# Altium PCB Switch_Matrix_32_2.PCBDOC (part 7 of 9)
Units mm, origin at the board's own origin, x right, y up, seen from the top; angles counter-clockwise.
Board outline 222.54 x 100 mm, 6 copper layers (L1, P2, L3, P4, L5, L6), stack 1.61 mm thick; 629 components, 583 nets, 2332 pads, 825 vias.
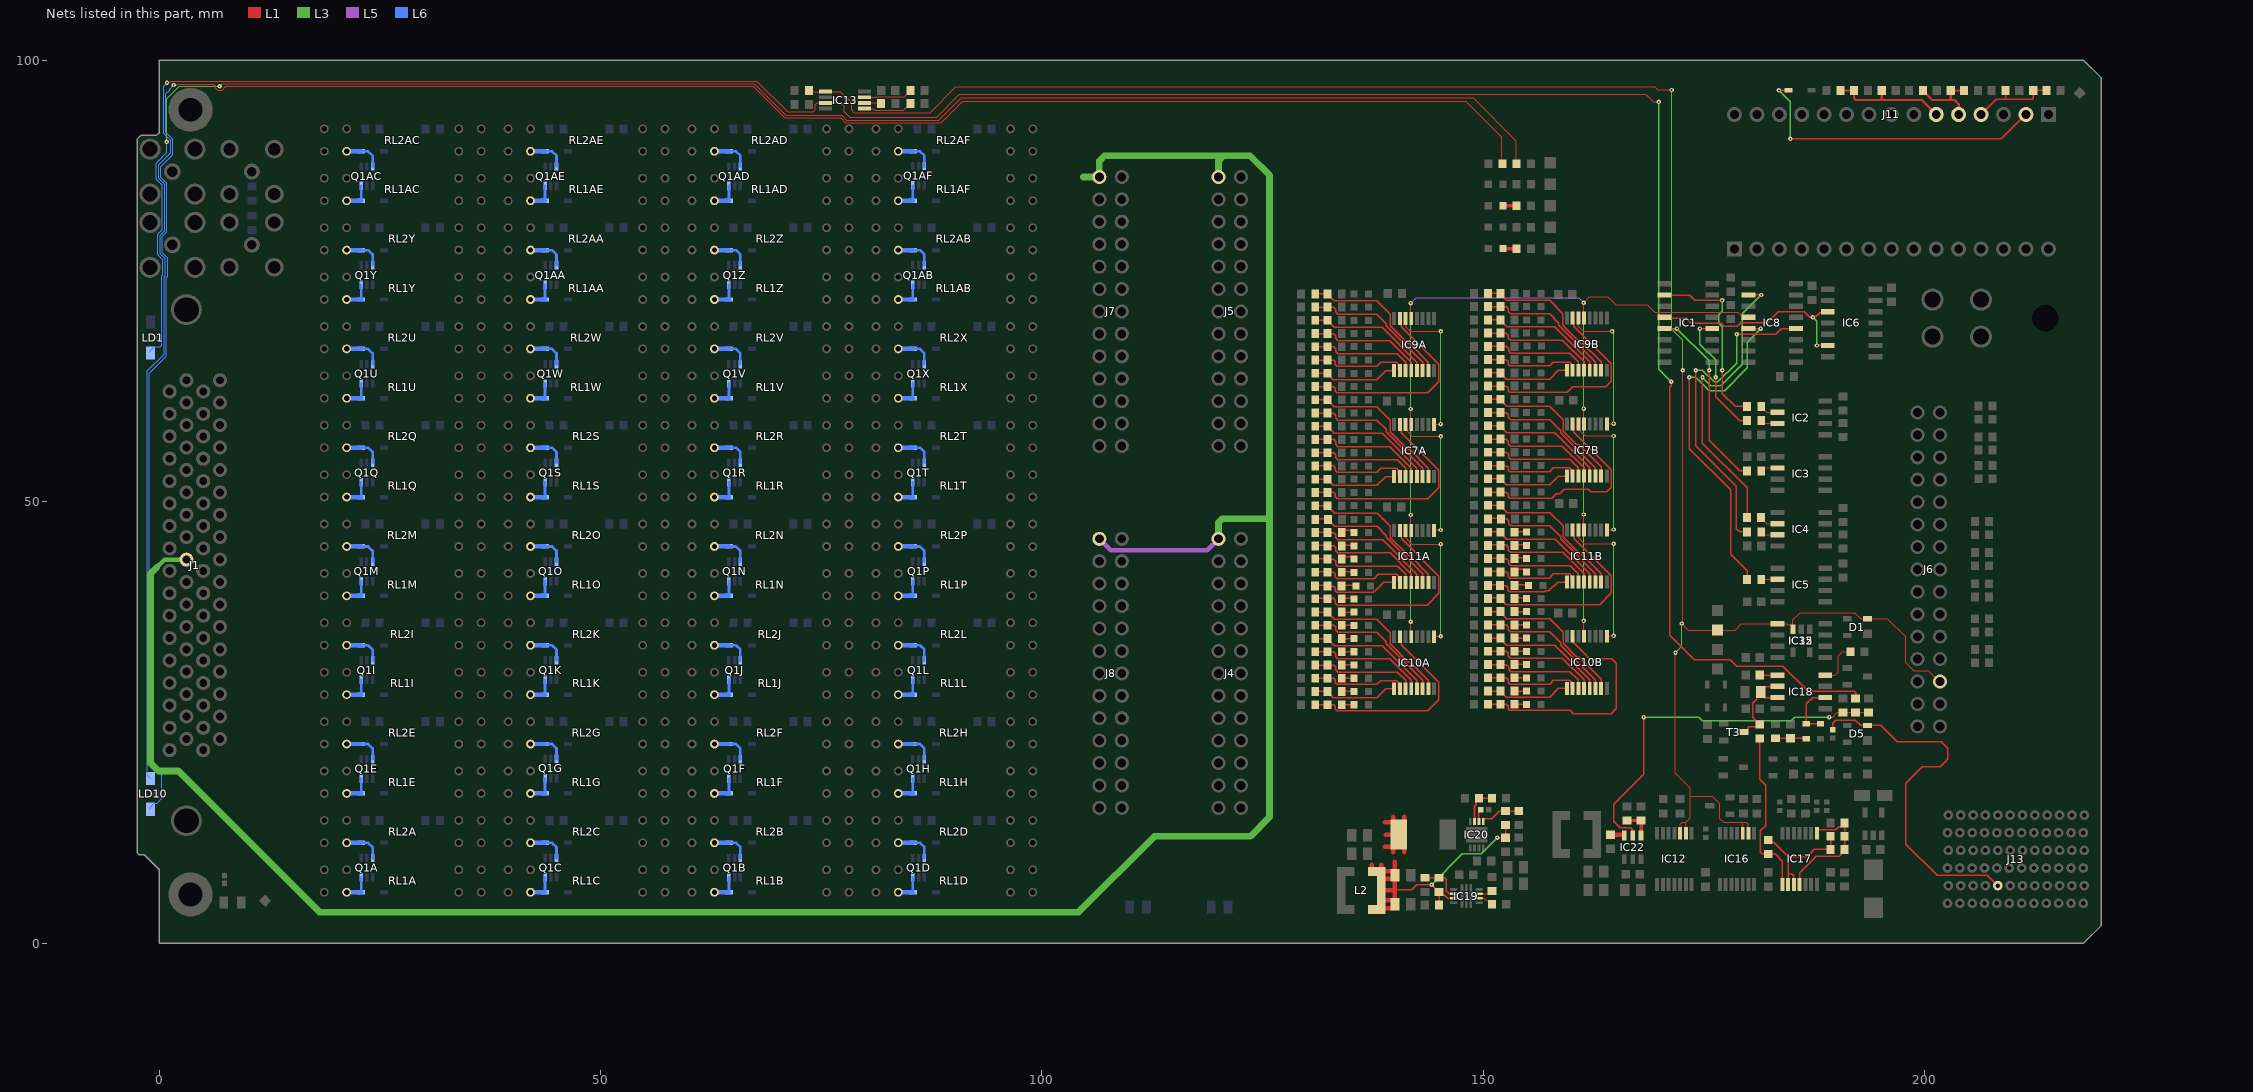
[diagram p10: the nets of this part, all layers, seen from the top]

## Via types
v1: diameter 0.5, hole 0.2, L1 to L6, tented both sides, 775 vias
v2: diameter 0.7, hole 0.4, L1 to L6, tented both sides, 41 vias
v3: diameter 0.5, hole 0.2, L1 to L6, 5 vias
v4: diameter 0.6, hole 0.3, L1 to L6, tented both sides, 4 vias

## Nets (pads, with @x,y where several pads share a name; then routed paths per layer and width w, separated by ;. In a path a pad name is that pad's centre, name@x,y a point inside that pad or via, vN(x,y) a via of type N, cw(c..) or ccw(c..) an arc to the next point about the centre after c; other vN are vias at no path point) (continued)
I2C0_SDA: D1.2 IC12.2 IC12.3 IC13.1 IC15.5 IC16.2 IC16.3 IC32.3 J6.26 R175.1 TP1.1 | length 235.7
  L1 w0.127: R175.1@73.6,96.6 73.725,96.475 IC13.1@75.5,96.475 77.186,96.475 78.476,95.185 78.476,94.381 78.768,94.089 87.359,94.089 90.272,97.002 169.41,97.002 169.765,96.647 v1(171.345,96.647) v1@171.354,96.647 ; v1(171.784,32.884) 171.784,19.216 173.465,17.535 173.465,16.551 ; IC12.3@172.31,12.465 172.31,13.437 172.537,13.665 172.96,13.665 ; v1(172.604,64.9) 172.604,36.461 172.571,36.428 172.571,36.271 v1(172.5,36.2) 173.24,35.46 TP1.1@176.551,35.46 178.56,35.46 179.265,36.165 IC15.5@183.351,36.165 184.404,36.165 184.522,36.047 184.864,36.047 IC32.3@185.1,35.811 ; IC12.2@172.96,12.465 172.96,13.665 ; IC16.3@179.409,12.465 179.409,13.665 ; IC16.2@180.059,12.465 180.059,13.437 179.831,13.665 179.409,13.665 ; IC32.3@185.1,35.561 IC32.3@185.1,35.811 ; J6.26@201.75,29.63 201.643,29.63 200.449,30.825 198.778,30.825 197.868,31.734 197.868,34.682 195.801,36.75 D1.2@193.55,36.75 192.75,36.75 192.1,37.4 185.9,37.4 185.1,36.6 IC32.3@185.1,35.811 ; 172.96,13.665 173.465,14.17 173.465,16.551 ; 173.465,16.551 173.54,16.625 175.965,16.625 176.8,15.791 176.8,14.1 177.235,13.665 179.409,13.665
  L3 w0.127: v1(171.345,96.647) 171.345,69.555 172.604,68.296 v1(172.604,64.9) ; v1(171.784,32.884) 172.5,33.6 v1(172.5,36.2)
N13V0_SCSI: J1.52 J4.26 J5.26 J7.26 J8.26 | length 285.9
  L5 w0.508: J8.26@106.517,45.796 107.814,44.5 118.721,44.5 J4.26@120.017,45.796
  L3 w0.508: -0.269,42.572 0.6,43.441 J1.52@2.759,43.441
  L3 w0.762: -0.269,42.572 -0.984,41.858 -0.984,20.384 -0.089,19.489 2.182,19.489 18.171,3.5 104.151,3.5 112.74,12.089 123.617,12.089 125.8,14.272 125.8,43.4 125.8,47.661 125.8,48.08 ; 104.696,86.796 J7.26@106.517,86.796 106.517,88.617 107.1,89.2 120.6,89.2 ; J4.26@120.017,45.796 120.017,47.634 120.464,48.08 125.8,48.08 ; J5.26@120.017,86.796 120.017,88.617 120.6,89.2 ; 120.6,89.2 123.6,89.2 125.8,87 125.8,48.08
NetC5_2: C5.2 J11.5 R19.1 R70.2 | length 8.5
  L1 w0.254: R19.1@199.837,96.6 199.837,96.55 200.887,95.5 202.965,95.5 ; J11.5@203.87,93.87 203.87,95.03 203.4,95.5 202.965,95.5 ; R70.2@204.5,96.562 R70.2@204.462,96.6 C5.2@202.975,96.6 202.975,95.51 202.965,95.5
NetC6_2: C6.2 J11.4 R71.2 R87.1 | length 10
  L1 w0.152: J11.4@206.41,93.87 208.14,95.6 209.2,95.6 ; R71.2@209.2,96.6 209.2,95.6 ; R87.1@213.8,96.6 212.3,96.6 212.3,95.7 212.2,95.6 209.2,95.6
NetC7_2: C7.2 J11.6 R18.1 R69.2 | length 13.6
  L1 w0.254: R18.1@190.5,96.6 R69.2@192.012,96.6 192.012,95.712 192.225,95.5 195.082,95.5 ; C7.2@195.15,96.6 195.15,95.568 195.082,95.5 ; J11.6@201.33,93.87 199.7,95.5 195.082,95.5
NetC11_2: C11.2 C13.2 C14.2 C32.2 IC19.6 L1.2 L2.1 R23.2 R118.2 | length 45.9
  L1 w0.152: 140,6.2 140.168,6.032 141.932,6.032 142.5,6.6 v1(144.15,6.6) 144.95,5.8 R23.2@145,5.8 C11.2@145,4.3 ; R23.2@145.028,5.436 145.622,5.436 145.983,5.075 IC19.6@146.642,5.075 ; v1(151.601,11.946) 152.526,11.946 C32.2@152.53,11.95 R118.2@152.53,13.35
  L1 w0.508: L2.1@137.387,7.869 137.387,8.869 ; L2.1@138.375,4.844 C13.2@139.875,4.844 ; L2.1@138.375,8.144 L2.1@138.463,8.144 ; L2.1@138.379,3.959 C13.2@139.879,3.959 ; L2.1@138.379,7.259 C14.2@139.879,7.259 ; L2.1@138.45,5.957 139.95,5.957 ; L2.1@138.463,7.404 L2.1@138.463,8.144 ; 138.463,8.864 L2.1@138.463,8.144 ; 138.825,10.918 L1.2@139.83,10.918 ; 138.825,13.668 L1.2@139.83,13.668 ; 138.942,12.293 L1.2@140.442,12.293 ; 139.83,10.262 L1.2@139.83,10.918 ; L1.2@139.83,11.762 L1.2@139.83,10.918 ; L1.2@139.83,12.824 L1.2@139.83,13.668 ; 139.83,14.324 L1.2@139.83,13.668 ; C14.2@139.875,8.144 L2.1@138.463,8.144 ; C13.2@140,4.4 140,5.9 ; 140,6.2 C14.2@140,7.7 140,9.2 ; L1.2@140.325,10.918 L1.2@139.83,10.918 ; L1.2@140.325,13.668 L1.2@139.83,13.668 ; 141.054,10.262 L1.2@141.054,11.762 ; L1.2@141.054,12.824 141.054,14.324
  L3 w0.152: v1(144.15,6.6) 147.65,10.1 149.755,10.1 v1(151.601,11.946)
NetC25_2: C25.2 IC18.6 IC18.7 R114.2 T3.3 | length 10.1
  L1 w0.152: T3.3@179.55,23.9 179.707,23.9 179.956,24.149 179.956,24.362 180.089,24.495 181.046,24.495 R114.2@181.326,24.775 181.276,24.775 180.902,25.149 180.902,25.199 180.539,25.561 180.539,27.141 181.021,27.622 181.021,28.005 C25.2@181.451,28.435 ; C25.2@181.451,29.05 183.316,29.05 IC18.6@183.351,29.085 ; C25.2@181.786,27.815 IC18.7@183.351,27.815 IC18.7@183.355,27.82
NetC27_2: C27.2 IC18.5 | length 2
  L1 w0.152: C27.2@181.351,30.355 IC18.5@183.351,30.355
NetC28_2: C28.2 D9.1 R116.2 | length 3.5
  L1 w0.152: R116.2@183.1,23.2 C28.2@184.8,23.2 186.55,23.2 D9.1@186.6,23.15
NetC30_2: C30.2 IC19.9 | length 1.8
  L1 w0.127: IC19.9@149.542,5.075 150.159,5.075 ; 150.145,5.075 150.415,4.805 150.595,4.805 C30.2@151,4.4
NetC33_2: C33.2 IC20.6 | length 1.4
  L1 w0.152: IC20.6@149.52,13.75 149.52,14.875 C33.2@149.74,15.095
NetC102_1: C102.1 IC22.6 | length 1.5
  L1 w0.508: C102.1@164.438,12.282 IC22.6@165.988,12.282
NetD3_2: D3.2 J11.2 | length 35
  L1 w0.152: v1(183.5,96.6) D3.2@184.6,96.6 ; v1(184.8,91.1) 208.72,91.1 J11.2@211.49,93.87
  L3 w0.152: v1(183.5,96.6) 184.8,95.3 v1(184.8,91.1)
NetD5_2: D5.2 J13.H2 R133.2 | length 41.6
  L1 w0.152: R133.2@189.6,24.17 189.6,24.9 189.969,25.269 192.131,25.269 192.75,24.65 D5.2@193.55,24.65 195.069,24.65 196.888,22.83 201.887,22.83 202.653,22.064 202.653,20.833 201.809,19.989 199.77,19.989 197.9,18.118 197.9,11.2 201.426,7.674 207.126,7.674 J13.H2@208.3,6.5
NetD8_2: D8.2 D9.2 IC18.2 | length 6.3
  L1 w0.152: D8.2@188.2,24.85 D9.2@186.6,24.85 186.6,27.1 187.315,27.815 IC18.2@188.751,27.815
NetD12A_2: D12A.2 Q1A.3 RL1A.2 | length 3.3
  L6 w0.152: D12A.2@22.878,5.76 D12A.2@22.878,5.76
  L6 w0.3: D12A.2@22.878,5.76 Q1A.3@22.877,7.434
  L6 w0.5: RL1A.2@21.234,5.76 D12A.2@22.878,5.76
NetD12AA_2: D12AA.2 Q1AA.3 RL1AA.2 | length 3.3
  L6 w0.152: D12AA.2@43.714,72.912 D12AA.2@43.714,72.912
  L6 w0.3: D12AA.2@43.714,72.912 Q1AA.3@43.713,74.586
  L6 w0.5: RL1AA.2@42.07,72.912 D12AA.2@43.714,72.912
NetD12AB_2: D12AB.2 Q1AB.3 RL1AB.2 | length 3.3
  L6 w0.152: D12AB.2@85.385,72.913 D12AB.2@85.386,72.912
  L6 w0.3: D12AB.2@85.385,72.913 Q1AB.3@85.385,74.586
  L6 w0.5: RL1AB.2@83.742,72.912 D12AB.2@85.386,72.912
NetD12AC_2: D12AC.2 Q1AC.3 RL1AC.2 | length 3.3
  L6 w0.152: D12AC.2@22.878,84.104 D12AC.2@22.878,84.104
  L6 w0.3: D12AC.2@22.878,84.104 Q1AC.3@22.877,85.778
  L6 w0.5: RL1AC.2@21.234,84.104 D12AC.2@22.878,84.104
NetD12AD_2: D12AD.2 Q1AD.3 RL1AD.2 | length 3.3
  L6 w0.152: D12AD.2@64.55,84.104 D12AD.2@64.55,84.104
  L6 w0.3: D12AD.2@64.55,84.104 Q1AD.3@64.549,85.778
  L6 w0.5: RL1AD.2@62.906,84.104 D12AD.2@64.55,84.104
NetD12AE_2: D12AE.2 Q1AE.3 RL1AE.2 | length 3.3
  L6 w0.152: D12AE.2@43.714,84.104 D12AE.2@43.714,84.104
  L6 w0.3: D12AE.2@43.714,84.104 Q1AE.3@43.713,85.778
  L6 w0.5: RL1AE.2@42.07,84.104 D12AE.2@43.714,84.104
NetD12AF_2: D12AF.2 Q1AF.3 RL1AF.2 | length 3.3
  L6 w0.152: D12AF.2@85.385,84.105 D12AF.2@85.386,84.104
  L6 w0.3: D12AF.2@85.385,84.105 Q1AF.3@85.385,85.778
  L6 w0.5: RL1AF.2@83.742,84.104 D12AF.2@85.386,84.104
NetD12B_2: D12B.2 Q1B.3 RL1B.2 | length 3.3
  L6 w0.152: D12B.2@64.55,5.76 D12B.2@64.55,5.76
  L6 w0.3: D12B.2@64.55,5.76 Q1B.3@64.549,7.434
  L6 w0.5: RL1B.2@62.906,5.76 D12B.2@64.55,5.76
NetD12C_2: D12C.2 Q1C.3 RL1C.2 | length 3.3
  L6 w0.152: D12C.2@43.714,5.76 D12C.2@43.714,5.76
  L6 w0.3: D12C.2@43.714,5.76 Q1C.3@43.713,7.434
  L6 w0.5: RL1C.2@42.07,5.76 D12C.2@43.714,5.76
NetD12D_2: D12D.2 Q1D.3 RL1D.2 | length 3.3
  L6 w0.152: D12D.2@85.385,5.761 D12D.2@85.386,5.76
  L6 w0.3: D12D.2@85.385,5.761 Q1D.3@85.385,7.434
  L6 w0.5: RL1D.2@83.742,5.76 D12D.2@85.386,5.76
NetD12E_2: D12E.2 Q1E.3 RL1E.2 | length 3.3
  L6 w0.152: D12E.2@22.878,16.952 D12E.2@22.878,16.952
  L6 w0.3: D12E.2@22.878,16.952 Q1E.3@22.877,18.626
  L6 w0.5: RL1E.2@21.234,16.952 D12E.2@22.878,16.952
NetD12F_2: D12F.2 Q1F.3 RL1F.2 | length 3.3
  L6 w0.152: D12F.2@64.55,16.952 D12F.2@64.55,16.952
  L6 w0.3: D12F.2@64.55,16.952 Q1F.3@64.549,18.626
  L6 w0.5: RL1F.2@62.906,16.952 D12F.2@64.55,16.952
NetD12G_2: D12G.2 Q1G.3 RL1G.2 | length 3.3
  L6 w0.152: D12G.2@43.714,16.952 D12G.2@43.714,16.952
  L6 w0.3: D12G.2@43.714,16.952 Q1G.3@43.713,18.626
  L6 w0.5: RL1G.2@42.07,16.952 D12G.2@43.714,16.952
NetD12H_2: D12H.2 Q1H.3 RL1H.2 | length 3.3
  L6 w0.152: D12H.2@85.385,16.953 D12H.2@85.386,16.952
  L6 w0.3: D12H.2@85.385,16.953 Q1H.3@85.385,18.626
  L6 w0.5: RL1H.2@83.742,16.952 D12H.2@85.386,16.952
NetD12I_2: D12I.2 Q1I.3 RL1I.2 | length 3.3
  L6 w0.152: D12I.2@22.877,28.145 D12I.2@22.878,28.144
  L6 w0.3: D12I.2@22.877,28.145 Q1I.3@22.877,29.818
  L6 w0.5: RL1I.2@21.234,28.144 D12I.2@22.878,28.144
NetD12J_2: D12J.2 Q1J.3 RL1J.2 | length 3.3
  L6 w0.152: D12J.2@64.549,28.145 D12J.2@64.55,28.144
  L6 w0.3: D12J.2@64.549,28.145 Q1J.3@64.549,29.818
  L6 w0.5: RL1J.2@62.906,28.144 D12J.2@64.55,28.144
NetD12K_2: D12K.2 Q1K.3 RL1K.2 | length 3.3
  L6 w0.152: D12K.2@43.713,28.145 D12K.2@43.714,28.144
  L6 w0.3: D12K.2@43.713,28.145 Q1K.3@43.713,29.818
  L6 w0.5: RL1K.2@42.07,28.144 D12K.2@43.714,28.144
NetD12L_2: D12L.2 Q1L.3 RL1L.2 | length 3.3
  L6 w0.152: D12L.2@85.385,28.145 D12L.2@85.386,28.144
  L6 w0.3: D12L.2@85.385,28.145 Q1L.3@85.385,29.818
  L6 w0.5: RL1L.2@83.742,28.144 D12L.2@85.386,28.144
NetD12M_2: D12M.2 Q1M.3 RL1M.2 | length 3.3
  L6 w0.152: D12M.2@22.878,39.336 D12M.2@22.878,39.336
  L6 w0.3: D12M.2@22.878,39.336 Q1M.3@22.877,41.01
  L6 w0.5: RL1M.2@21.234,39.336 D12M.2@22.878,39.336
NetD12N_2: D12N.2 Q1N.3 RL1N.2 | length 3.3
  L6 w0.152: D12N.2@64.55,39.336 D12N.2@64.55,39.336
  L6 w0.3: D12N.2@64.55,39.336 Q1N.3@64.549,41.01
  L6 w0.5: RL1N.2@62.906,39.336 D12N.2@64.55,39.336
NetD12O_2: D12O.2 Q1O.3 RL1O.2 | length 3.3
  L6 w0.152: D12O.2@43.714,39.336 D12O.2@43.714,39.336
  L6 w0.3: D12O.2@43.714,39.336 Q1O.3@43.713,41.01
  L6 w0.5: RL1O.2@42.07,39.336 D12O.2@43.714,39.336
NetD12P_2: D12P.2 Q1P.3 RL1P.2 | length 3.3
  L6 w0.152: D12P.2@85.385,39.337 D12P.2@85.386,39.336
  L6 w0.3: D12P.2@85.385,39.337 Q1P.3@85.385,41.01
  L6 w0.5: RL1P.2@83.742,39.336 D12P.2@85.386,39.336
NetD12Q_2: D12Q.2 Q1Q.3 RL1Q.2 | length 3.3
  L6 w0.152: D12Q.2@22.878,50.528 D12Q.2@22.878,50.528
  L6 w0.3: D12Q.2@22.878,50.528 Q1Q.3@22.877,52.202
  L6 w0.5: RL1Q.2@21.234,50.528 D12Q.2@22.878,50.528
NetD12R_2: D12R.2 Q1R.3 RL1R.2 | length 3.3
  L6 w0.152: D12R.2@64.55,50.528 D12R.2@64.55,50.528
  L6 w0.3: D12R.2@64.55,50.528 Q1R.3@64.549,52.202
  L6 w0.5: RL1R.2@62.906,50.528 D12R.2@64.55,50.528
NetD12S_2: D12S.2 Q1S.3 RL1S.2 | length 3.3
  L6 w0.152: D12S.2@43.714,50.528 D12S.2@43.714,50.528
  L6 w0.3: D12S.2@43.714,50.528 Q1S.3@43.713,52.202
  L6 w0.5: RL1S.2@42.07,50.528 D12S.2@43.714,50.528
NetD12T_2: D12T.2 Q1T.3 RL1T.2 | length 3.3
  L6 w0.152: D12T.2@85.385,50.529 D12T.2@85.386,50.528
  L6 w0.3: D12T.2@85.385,50.529 Q1T.3@85.385,52.202
  L6 w0.5: RL1T.2@83.742,50.528 D12T.2@85.386,50.528
NetD12U_2: D12U.2 Q1U.3 RL1U.2 | length 3.3
  L6 w0.152: D12U.2@22.877,61.721 D12U.2@22.878,61.72
  L6 w0.3: D12U.2@22.877,61.721 Q1U.3@22.877,63.394
  L6 w0.5: RL1U.2@21.234,61.72 D12U.2@22.878,61.72
NetD12V_2: D12V.2 Q1V.3 RL1V.2 | length 3.3
  L6 w0.152: D12V.2@64.549,61.721 D12V.2@64.55,61.72
  L6 w0.3: D12V.2@64.549,61.721 Q1V.3@64.549,63.394
  L6 w0.5: RL1V.2@62.906,61.72 D12V.2@64.55,61.72
NetD12W_2: D12W.2 Q1W.3 RL1W.2 | length 3.3
  L6 w0.152: D12W.2@43.714,61.72 D12W.2@43.713,61.721
  L6 w0.3: D12W.2@43.713,61.721 Q1W.3@43.713,63.394
  L6 w0.5: RL1W.2@42.07,61.72 D12W.2@43.714,61.72
NetD12X_2: D12X.2 Q1X.3 RL1X.2 | length 3.3
  L6 w0.152: D12X.2@85.385,61.721 D12X.2@85.386,61.72
  L6 w0.3: D12X.2@85.385,61.721 Q1X.3@85.385,63.394
  L6 w0.5: RL1X.2@83.742,61.72 D12X.2@85.386,61.72
NetD12Y_2: D12Y.2 Q1Y.3 RL1Y.2 | length 3.3
  L6 w0.152: D12Y.2@22.878,72.912 D12Y.2@22.878,72.912
  L6 w0.3: D12Y.2@22.878,72.912 Q1Y.3@22.877,74.586
  L6 w0.5: RL1Y.2@21.234,72.912 D12Y.2@22.878,72.912
NetD12Z_2: D12Z.2 Q1Z.3 RL1Z.2 | length 3.3
  L6 w0.152: D12Z.2@64.55,72.912 D12Z.2@64.55,72.912
  L6 w0.3: D12Z.2@64.55,72.912 Q1Z.3@64.549,74.586
  L6 w0.5: RL1Z.2@62.906,72.912 D12Z.2@64.55,72.912
NetD13A_2: D13A.2 Q1A.6 RL2A.2 | length 4.4
  L6 w0.3: D13A.2@22.878,11.356 23.679,11.356 24.177,10.858 Q1A.6@24.177,9.634
  L6 w0.5: RL2A.2@21.234,11.356 D13A.2@22.878,11.356
NetD13AA_2: D13AA.2 Q1AA.6 RL2AA.2 | length 4.4
  L6 w0.3: D13AA.2@43.714,78.508 44.515,78.508 45.013,78.01 Q1AA.6@45.013,76.786
  L6 w0.5: RL2AA.2@42.07,78.508 D13AA.2@43.714,78.508
NetD13AB_2: D13AB.2 Q1AB.6 RL2AB.2 | length 4.4
  L6 w0.3: D13AB.2@85.386,78.508 86.187,78.508 86.685,78.01 Q1AB.6@86.685,76.786
  L6 w0.5: RL2AB.2@83.742,78.508 D13AB.2@85.386,78.508
NetD13AC_2: D13AC.2 Q1AC.6 RL2AC.2 | length 4.4
  L6 w0.3: D13AC.2@22.878,89.7 23.679,89.7 24.177,89.202 Q1AC.6@24.177,87.978
  L6 w0.5: RL2AC.2@21.234,89.7 D13AC.2@22.878,89.7
NetD13AD_2: D13AD.2 Q1AD.6 RL2AD.2 | length 4.4
  L6 w0.3: D13AD.2@64.55,89.7 65.351,89.7 65.849,89.202 Q1AD.6@65.849,87.978
  L6 w0.5: RL2AD.2@62.906,89.7 D13AD.2@64.55,89.7
NetD13AE_2: D13AE.2 Q1AE.6 RL2AE.2 | length 4.4
  L6 w0.3: D13AE.2@43.714,89.7 44.515,89.7 45.013,89.202 Q1AE.6@45.013,87.978
  L6 w0.5: RL2AE.2@42.07,89.7 D13AE.2@43.714,89.7
NetD13AF_2: D13AF.2 Q1AF.6 RL2AF.2 | length 4.4
  L6 w0.3: D13AF.2@85.386,89.7 86.187,89.7 86.685,89.202 Q1AF.6@86.685,87.978
  L6 w0.5: RL2AF.2@83.742,89.7 D13AF.2@85.386,89.7
NetD13B_2: D13B.2 Q1B.6 RL2B.2 | length 4.4
  L6 w0.3: D13B.2@64.55,11.356 65.351,11.356 65.849,10.858 Q1B.6@65.849,9.634
  L6 w0.5: RL2B.2@62.906,11.356 D13B.2@64.55,11.356
NetD13C_2: D13C.2 Q1C.6 RL2C.2 | length 4.4
  L6 w0.3: D13C.2@43.714,11.356 44.515,11.356 45.013,10.858 Q1C.6@45.013,9.634
  L6 w0.5: RL2C.2@42.07,11.356 D13C.2@43.714,11.356
NetD13D_2: D13D.2 Q1D.6 RL2D.2 | length 4.4
  L6 w0.3: D13D.2@85.386,11.356 86.187,11.356 86.685,10.858 Q1D.6@86.685,9.634
  L6 w0.5: RL2D.2@83.742,11.356 D13D.2@85.386,11.356
NetD13E_2: D13E.2 Q1E.6 RL2E.2 | length 4.4
  L6 w0.3: D13E.2@22.878,22.548 23.679,22.548 24.177,22.05 Q1E.6@24.177,20.826
  L6 w0.5: RL2E.2@21.234,22.548 D13E.2@22.878,22.548
NetD13F_2: D13F.2 Q1F.6 RL2F.2 | length 4.4
  L6 w0.3: D13F.2@64.55,22.548 65.351,22.548 65.849,22.05 Q1F.6@65.849,20.826
  L6 w0.5: RL2F.2@62.906,22.548 D13F.2@64.55,22.548
NetD13G_2: D13G.2 Q1G.6 RL2G.2 | length 4.4
  L6 w0.3: D13G.2@43.714,22.548 44.515,22.548 45.013,22.05 Q1G.6@45.013,20.826
  L6 w0.5: RL2G.2@42.07,22.548 D13G.2@43.714,22.548
NetD13H_2: D13H.2 Q1H.6 RL2H.2 | length 4.4
  L6 w0.3: D13H.2@85.386,22.548 86.187,22.548 86.685,22.05 Q1H.6@86.685,20.826
  L6 w0.5: RL2H.2@83.742,22.548 D13H.2@85.386,22.548
NetD13I_2: D13I.2 Q1I.6 RL2I.2 | length 4.4
  L6 w0.3: D13I.2@22.878,33.74 23.679,33.74 24.177,33.242 Q1I.6@24.177,32.018
  L6 w0.5: RL2I.2@21.234,33.74 D13I.2@22.878,33.74
NetD13J_2: D13J.2 Q1J.6 RL2J.2 | length 4.4
  L6 w0.3: D13J.2@64.55,33.74 65.351,33.74 65.849,33.242 Q1J.6@65.849,32.018
  L6 w0.5: RL2J.2@62.906,33.74 D13J.2@64.55,33.74
NetD13K_2: D13K.2 Q1K.6 RL2K.2 | length 4.4
  L6 w0.3: D13K.2@43.714,33.74 44.515,33.74 45.013,33.242 Q1K.6@45.013,32.018
  L6 w0.5: RL2K.2@42.07,33.74 D13K.2@43.714,33.74
NetD13L_2: D13L.2 Q1L.6 RL2L.2 | length 4.4
  L6 w0.3: D13L.2@85.386,33.74 86.187,33.74 86.685,33.242 Q1L.6@86.685,32.018
  L6 w0.5: RL2L.2@83.742,33.74 D13L.2@85.386,33.74
NetD13M_2: D13M.2 Q1M.6 RL2M.2 | length 4.4
  L6 w0.3: D13M.2@22.878,44.932 23.679,44.932 24.177,44.434 Q1M.6@24.177,43.21
  L6 w0.5: RL2M.2@21.234,44.932 D13M.2@22.878,44.932
NetD13N_2: D13N.2 Q1N.6 RL2N.2 | length 4.4
  L6 w0.3: D13N.2@64.55,44.932 65.351,44.932 65.849,44.434 Q1N.6@65.849,43.21
  L6 w0.5: RL2N.2@62.906,44.932 D13N.2@64.55,44.932
NetD13O_2: D13O.2 Q1O.6 RL2O.2 | length 4.4
  L6 w0.3: D13O.2@43.714,44.932 44.515,44.932 45.013,44.434 Q1O.6@45.013,43.21
  L6 w0.5: RL2O.2@42.07,44.932 D13O.2@43.714,44.932
NetD13P_2: D13P.2 Q1P.6 RL2P.2 | length 4.4
  L6 w0.3: D13P.2@85.386,44.932 86.187,44.932 86.685,44.434 Q1P.6@86.685,43.21
  L6 w0.5: RL2P.2@83.742,44.932 D13P.2@85.386,44.932
NetD13Q_2: D13Q.2 Q1Q.6 RL2Q.2 | length 4.4
  L6 w0.3: D13Q.2@22.878,56.124 23.679,56.124 24.177,55.626 Q1Q.6@24.177,54.402
  L6 w0.5: RL2Q.2@21.234,56.124 D13Q.2@22.878,56.124
NetD13R_2: D13R.2 Q1R.6 RL2R.2 | length 4.4
  L6 w0.3: D13R.2@64.55,56.124 65.351,56.124 65.849,55.626 Q1R.6@65.849,54.402
  L6 w0.5: RL2R.2@62.906,56.124 D13R.2@64.55,56.124
NetD13S_2: D13S.2 Q1S.6 RL2S.2 | length 4.4
  L6 w0.3: D13S.2@43.714,56.124 44.515,56.124 45.013,55.626 Q1S.6@45.013,54.402
  L6 w0.5: RL2S.2@42.07,56.124 D13S.2@43.714,56.124
NetD13T_2: D13T.2 Q1T.6 RL2T.2 | length 4.4
  L6 w0.3: D13T.2@85.386,56.124 86.187,56.124 86.685,55.626 Q1T.6@86.685,54.402
  L6 w0.5: RL2T.2@83.742,56.124 D13T.2@85.386,56.124
NetD13U_2: D13U.2 Q1U.6 RL2U.2 | length 4.4
  L6 w0.3: D13U.2@22.878,67.316 23.679,67.316 24.177,66.818 Q1U.6@24.177,65.594
  L6 w0.5: RL2U.2@21.234,67.316 D13U.2@22.878,67.316
NetD13V_2: D13V.2 Q1V.6 RL2V.2 | length 4.4
  L6 w0.3: D13V.2@64.55,67.316 65.351,67.316 65.849,66.818 Q1V.6@65.849,65.594
  L6 w0.5: RL2V.2@62.906,67.316 D13V.2@64.55,67.316
NetD13W_2: D13W.2 Q1W.6 RL2W.2 | length 4.4
  L6 w0.3: D13W.2@43.714,67.316 44.515,67.316 45.013,66.818 Q1W.6@45.013,65.594
  L6 w0.5: RL2W.2@42.07,67.316 D13W.2@43.714,67.316
NetD13X_2: D13X.2 Q1X.6 RL2X.2 | length 4.4
  L6 w0.3: D13X.2@85.386,67.316 86.187,67.316 86.685,66.818 Q1X.6@86.685,65.594
  L6 w0.5: RL2X.2@83.742,67.316 D13X.2@85.386,67.316
NetD13Y_2: D13Y.2 Q1Y.6 RL2Y.2 | length 4.4
  L6 w0.3: D13Y.2@22.878,78.508 23.679,78.508 24.177,78.01 Q1Y.6@24.177,76.786
  L6 w0.5: RL2Y.2@21.234,78.508 D13Y.2@22.878,78.508
NetD13Z_2: D13Z.2 Q1Z.6 RL2Z.2 | length 4.4
  L6 w0.3: D13Z.2@64.55,78.508 65.351,78.508 65.849,78.01 Q1Z.6@65.849,76.786
  L6 w0.5: RL2Z.2@62.906,78.508 D13Z.2@64.55,78.508
NetIC1_2: IC1.2 R10.1 | length 21.1
  L1 w0.152: IC1.2@170.55,73.425 170.575,73.4 173.4,73.4 173.99,72.81 v1(177.068,72.81) ; v1(177.1,64.9) 177.1,62.261 178.561,60.8 R10.1@179.901,60.8
  L3 w0.152: v1(177.068,72.81) 177.068,71.568 176.674,71.174 176.674,70.226 177.1,69.8 v1(177.1,64.9)
NetIC1_4: IC1.4 IC6.3 IC6.6 | length 24.8
  L1 w0.152: IC1.4@170.55,70.885 170.635,70.8 173,70.8 173.6,70.2 176.953,70.2 177.253,69.9 178.806,69.9 179.206,70.3 182.2,70.3 183.42,71.52 186.372,71.52 186.981,70.911 v1(187.358,70.911) 187.393,70.945 187.696,70.945 188.136,71.385 188.915,71.385 IC6.3@189.05,71.52 ; v1@187.7,67.7 187.71,67.71 IC6.6@189.05,67.71 IC6.6@189.06,67.7
  L3 w0.152: v1(187.358,70.911) 187.81,70.459 v1(187.81,67.7)
NetIC1_5: IC1.5 R11.1 | length 21.2
  L1 w0.152: IC1.5@170.565,69.6 IC1.5@170.55,69.615 v1(171.945,69.615) ; v1@175.6,64.8 175.6,56.951 179.054,53.497 R11.1@179.901,53.497
  L3 w0.152: v1(171.945,69.615) 175.6,65.96 v1(175.6,64.9)
NetIC1_12: IC1.12 R8.1 | length 14.5
  L1 w0.152: v1(174.555,69.615) IC1.12@175.95,69.615 IC1.12@175.935,69.6 ; v1(176.343,64.1) 176.343,61.908 179.054,59.197 R8.1@179.901,59.197
  L3 w0.152: v1(174.555,69.615) 174.555,67.845 176.343,66.057 v1(176.343,64.1)
NetIC2_6: IC2.6 R10.2 | length 2.2
  L1 w0.127: R10.2@181.501,60.8 181.501,60.75 182.116,60.135 IC2.6@183.351,60.135
NetIC2_7: IC2.7 R8.2 | length 2
  L1 w0.127: R8.2@181.501,59.197 181.833,58.865 IC2.7@183.351,58.865
NetIC3_2: IC3.2 R11.2 | length 2
  L1 w0.127: R11.2@181.501,53.497 181.834,53.83 IC3.2@183.351,53.83
NetIC4_6: IC4.6 R15.2 | length 2.2
  L1 w0.127: R15.2@181.5,48.2 181.5,48.15 182.135,47.515 IC4.6@183.351,47.515
NetIC4_7: IC4.7 R13.2 | length 2
  L1 w0.127: R13.2@181.501,46.572 181.834,46.24 IC4.7@183.351,46.24
NetIC5_6: IC5.6 R17.2 | length 1.8
  L1 w0.127: R17.2@181.501,41.205 IC5.6@183.351,41.205
NetIC7A_1: IC7A.1 R38A.1 R39A.1 | length 9.6
  L1 w0.152: R39A.1@130.975,52.55 132.325,52.55 132.375,52.5 133.028,51.847 137.943,51.847 138.947,52.85 IC7A.1@139.9,52.85
NetIC7A_2: IC7A.2 R40A.1 R41A.1 | length 11
  L1 w0.152: R41A.1@130.975,54.05 133.054,54.05 133.247,53.856 133.247,53.54 133.441,53.347 137.943,53.347 138.375,53.778 140.209,53.778 140.401,53.586 140.401,52.999 IC7A.2@140.55,52.85
NetIC7A_3: IC7A.3 R42A.1 R43A.1 | length 12.1
  L1 w0.152: R43A.1@130.975,55.55 133.054,55.55 133.294,55.31 133.294,54.994 133.534,54.753 140.25,54.753 141.2,53.804 IC7A.3@141.2,52.85
NetIC7A_4: IC7A.4 R44A.1 R45A.1 | length 13.4
  L1 w0.152: R45A.1@130.975,57.05 133.05,57.05 133.292,56.808 133.292,56.495 133.534,56.253 139.4,56.253 141.85,53.804 IC7A.4@141.85,52.85
NetIC7A_5: IC7A.5 R46A.1 R47A.1 | length 14.5
  L1 w0.152: R47A.1@130.975,58.55 R46A.1@132.375,58.55 132.375,58.5 133.122,57.753 138.55,57.753 142.5,53.804 IC7A.5@142.5,52.85
NetIC7A_6: IC7A.6 R48A.1 R49A.1 | length 16
  L1 w0.152: R49A.1@130.975,60.05 133.05,60.05 133.292,59.808 133.292,59.495 133.534,59.253 137.943,59.253 139.009,58.188 139.009,57.945 143.15,53.804 IC7A.6@143.15,52.85
NetIC7A_7: IC7A.7 R50A.1 R51A.1 | length 17.8
  L1 w0.152: R51A.1@130.975,61.55 R50A.1@132.375,61.55 132.375,61.5 133.122,60.753 137.943,60.753 139.468,59.229 139.468,57.945 141.538,55.874 141.729,55.874 143.8,53.804 IC7A.7@143.8,52.85
NetIC7A_9: IC7A.9 IC9A.14 | length 16.4
  L1 w0.127: IC9A.14@141.2,70.75 141.2,69.835 141.735,69.3 v1(145.197,69.3) ; IC7A.9@144.45,58.75 144.5,58.8 v1(145.2,58.8)
  L3 w0.127: v1(145.197,69.3) 145.198,69.298 v1(145.2,58.8) v1(145.2,58.8)
NetIC7A_13: IC7A.13 IC7B.13 IC8.4 IC9A.13 IC9B.13 IC10A.13 IC10B.13 IC11A.13 IC11B.13 | length 126.7
  L1 w0.127: v1(141.8,36.397) 141.8,34.75 IC10A.13@141.85,34.7 ; v1(141.8,48.5) 141.8,46.8 IC11A.13@141.85,46.75 ; v1(141.8,60.5) 141.8,58.8 IC7A.13@141.85,58.75 ; v1(141.8,72.5) 141.8,70.8 IC9A.13@141.85,70.75 ; v1(161.375,36.5) 161.375,34.8 IC10B.13@161.425,34.75 ; v1(161.375,48.55) 161.375,46.85 IC11B.13@161.425,46.8 ; v1(161.375,60.55) 161.375,58.85 IC7B.13@161.425,58.8 ; IC9B.13@161.425,70.3 IC9B.13@161.425,70.8 161.375,70.85 v1(161.375,72.55) 162.025,73.2 164.1,73.2 165,72.3 168.6,72.3 169.428,71.472 178.869,71.472 179.22,71.121 179.814,71.121 IC8.4@180.05,70.885
  L5 w0.127: v1(141.8,72.5) 142.4,73.1 160.825,73.1 v1(161.375,72.55)
  L3 w0.127: v1(141.8,36.397) v1(141.8,60.5) v1(141.8,72.5) ; v1(161.375,36.5) v1(161.375,60.55) v1(161.375,72.55)
NetIC7A_14: IC7A.14 IC11A.9 | length 16.3
  L1 w0.127: IC7A.14@141.2,58.75 141.2,58.25 141.435,58.016 141.435,57.946 141.981,57.4 v1(145.2,57.4) ; IC11A.9@144.45,46.75 144.5,46.8 v1(145.2,46.8)
  L3 w0.127: v1(145.2,46.8) v1(145.2,57.4)
NetIC7A_15: IC7A.15 R36A.1 R37A.1 | length 24.5
  L1 w0.152: R37A.1@130.975,51.05 133.054,51.05 133.247,50.856 133.247,50.54 133.441,50.347 143.693,50.347 144.957,51.611 144.957,53.58 140.699,57.839 140.699,58.601 IC7A.15@140.55,58.75 ; R36A.1@132.375,51 132.749,50.626 R36A.1@132.799,50.626
NetIC7B_1: IC7B.1 R38B.1 R39B.1 | length 9.6
  L1 w0.152: R39B.1@150.55,52.6 151.9,52.6 151.95,52.55 152.603,51.897 157.518,51.897 158.522,52.9 IC7B.1@159.475,52.9
NetIC7B_2: IC7B.2 R40B.1 R41B.1 | length 11
  L1 w0.152: R41B.1@150.55,54.1 152.629,54.1 152.822,53.906 152.822,53.59 153.016,53.397 157.518,53.397 157.95,53.828 159.784,53.828 159.976,53.636 159.976,53.049 IC7B.2@160.125,52.9
NetIC7B_3: IC7B.3 R42B.1 R43B.1 | length 12.1
  L1 w0.152: R43B.1@150.55,55.6 152.629,55.6 152.869,55.36 152.869,55.044 153.109,54.803 159.825,54.803 160.775,53.854 IC7B.3@160.775,52.9
NetIC7B_4: IC7B.4 R44B.1 R45B.1 | length 13.4
  L1 w0.152: R45B.1@150.55,57.1 152.625,57.1 152.867,56.858 152.867,56.545 153.109,56.303 158.975,56.303 161.425,53.854 IC7B.4@161.425,52.9
NetIC7B_5: IC7B.5 R46B.1 R47B.1 | length 14.5
  L1 w0.152: R47B.1@150.55,58.6 R46B.1@151.95,58.6 151.95,58.55 152.697,57.803 158.125,57.803 162.075,53.854 IC7B.5@162.075,52.9
NetIC7B_6: IC7B.6 R48B.1 R49B.1 | length 16
  L1 w0.152: R49B.1@150.55,60.1 152.625,60.1 152.867,59.858 152.867,59.545 153.109,59.303 157.518,59.303 158.767,58.054 158.767,57.811 162.725,53.854 IC7B.6@162.725,52.9
NetIC7B_7: IC7B.7 R50B.1 R51B.1 | length 17.8
  L1 w0.152: R51B.1@150.55,61.6 R50B.1@151.95,61.6 151.95,61.55 152.697,60.803 157.518,60.803 159.047,59.275 159.047,57.991 160.585,56.453 160.863,56.453 163.375,53.94 IC7B.7@163.375,52.9
NetIC7B_9: IC7B.9 IC9B.14 | length 16.3
  L1 w0.127: IC9B.14@160.775,70.8 160.775,69.885 161.36,69.3 v1(164.6,69.3) ; IC7B.9@164.025,58.8 164.075,58.85 v1(164.775,58.85)
  L3 w0.127: v1(164.6,69.3) 164.6,69.199 164.775,69.024 v1(164.775,58.85)
NetIC7B_14: IC7B.14 IC11B.9 | length 16.3
  L1 w0.127: IC7B.14@160.775,58.8 160.775,58.3 161.01,58.066 161.01,57.996 161.556,57.45 v1(164.775,57.45) ; IC11B.9@164.025,46.8 164.075,46.85 v1(164.775,46.85)
  L3 w0.127: v1(164.775,46.85) v1(164.775,57.45)
NetIC7B_15: IC7B.15 R36B.1 R37B.1 | length 24.7
  L1 w0.152: R37B.1@150.55,51.1 152.629,51.1 152.822,50.906 152.822,50.59 153.016,50.397 157.797,50.397 158.298,50.898 158.698,50.898 159.2,51.4 161.906,51.4 162.203,51.103 163.975,51.103 164.532,51.661 164.532,53.63 160.274,57.889 160.274,58.651 IC7B.15@160.125,58.8 ; R36B.1@151.95,51.05 R36B.1@152.324,50.676
NetIC8_2: IC8.2 R15.1 | length 34.1
  L1 w0.152: v1(174.843,64.1) 174.843,56.629 179.9,51.572 R15.1@179.9,48.2 ; IC8.2@180.05,73.434 IC8.2@180.069,73.416 ; IC8.2@180.069,73.425 v1@181.471,73.425
  L3 w0.152: v1(174.843,64.1) 175.807,63.136 176.909,63.136 179.347,65.574 179.347,71.279 v1(181.493,73.425)
NetIC8_5: IC8.5 R17.1 | length 40.6
  L1 w0.152: v1(173.36,64.1) 173.36,56.015 178.026,51.349 178.026,44.074 179.901,42.199 R17.1@179.901,41.205 ; IC8.5@180.05,69.615 v1(181.445,69.615)
  L1 w0.254: IC8.5@179.882,69.447 IC8.5@180.05,69.615
  L3 w0.152: v1(173.36,64.1) 174.093,64.1 175.613,62.58 177.341,62.58 179.924,65.163 179.924,68.094 v1(181.445,69.615)
NetIC8_12: IC8.12 R13.1 | length 37.5
  L1 w0.152: v1@174.087,64.8 174.087,56.316 178.679,51.725 178.679,46.948 179.054,46.572 R13.1@179.901,46.572 ; v1(178.711,68.974) 178.72,68.965 183.15,68.965 183.784,69.6 185.435,69.6 IC8.12@185.45,69.615
  L3 w0.152: v1(174.087,64.9) 174.821,64.9 176.153,63.568 176.601,63.568 178.711,65.678 v1(178.711,68.974)
NetIC9A_1: IC9A.1 R54A.1 R55A.1 | length 9.7
  L1 w0.152: R55A.1@130.975,64.55 R54A.1@132.375,64.55 132.375,64.5 133.028,63.847 137.947,63.847 138.95,64.85 IC9A.1@139.9,64.85
NetIC9A_2: IC9A.2 R57A.1 R58A.1 | length 11
  L1 w0.152: R58A.1@130.975,66.05 133.054,66.05 133.247,65.856 133.247,65.54 133.441,65.347 137.943,65.347 138.375,65.778 140.209,65.778 140.401,65.586 140.401,64.999 IC9A.2@140.55,64.85
NetIC9A_3: IC9A.3 R59A.1 R60A.1 | length 12.1
  L1 w0.152: R60A.1@130.975,67.55 133.054,67.55 133.294,67.31 133.294,66.994 133.534,66.753 140.25,66.753 141.2,65.804 IC9A.3@141.2,64.85
NetIC9A_4: IC9A.4 R61A.1 R62A.1 | length 13.4
  L1 w0.152: R62A.1@130.975,69.05 133.05,69.05 133.292,68.808 133.292,68.495 133.534,68.253 139.4,68.253 141.85,65.804 IC9A.4@141.85,64.85
NetIC9A_5: IC9A.5 R63A.1 R64A.1 | length 14.5
  L1 w0.152: R64A.1@130.975,70.55 R63A.1@132.375,70.55 132.375,70.5 133.122,69.753 138.55,69.753 142.5,65.804 IC9A.5@142.5,64.85
NetIC9A_6: IC9A.6 R65A.1 R66A.1 | length 16
  L1 w0.152: R66A.1@130.975,72.05 133.05,72.05 133.292,71.808 133.292,71.495 133.534,71.253 137.943,71.253 139.009,70.188 139.009,69.945 143.15,65.804 IC9A.6@143.15,64.85
NetIC9A_7: IC9A.7 R67A.1 R68A.1 | length 17.8
  L1 w0.152: R68A.1@130.975,73.55 R67A.1@132.375,73.55 132.375,73.5 133.122,72.753 137.943,72.753 139.468,71.229 139.468,69.945 141.538,67.874 141.729,67.874 143.8,65.804 IC9A.7@143.8,64.85
NetIC9A_15: IC9A.15 R52A.1 R53A.1 | length 23.9
  L1 w0.152: R53A.1@130.975,63.05 133.054,63.05 133.247,62.856 133.247,62.54 133.441,62.347 143.693,62.347 144.957,63.611 144.957,65.58 140.699,69.839 140.699,70.601 IC9A.15@140.55,70.75
NetIC9B_1: IC9B.1 R54B.1 R55B.1 | length 9.7
  L1 w0.152: R55B.1@150.55,64.6 R54B.1@151.95,64.6 151.95,64.55 152.603,63.897 157.518,63.897 158.522,64.9 IC9B.1@159.475,64.9
NetIC9B_2: IC9B.2 R57B.1 R58B.1 | length 11
  L1 w0.152: R58B.1@150.55,66.1 152.629,66.1 152.822,65.906 152.822,65.59 153.016,65.397 157.518,65.397 157.95,65.828 159.784,65.828 159.976,65.636 159.976,65.049 IC9B.2@160.125,64.9
NetIC9B_3: IC9B.3 R59B.1 R60B.1 | length 12.1
  L1 w0.152: R60B.1@150.55,67.6 152.629,67.6 152.869,67.36 152.869,67.044 153.109,66.803 159.825,66.803 160.775,65.854 IC9B.3@160.775,64.9
NetIC9B_4: IC9B.4 R61B.1 R62B.1 | length 13.4
  L1 w0.152: R62B.1@150.55,69.1 152.625,69.1 152.867,68.858 152.867,68.545 153.109,68.303 158.975,68.303 161.425,65.854 IC9B.4@161.425,64.9
NetIC9B_5: IC9B.5 R63B.1 R64B.1 | length 14.5
  L1 w0.152: R64B.1@150.55,70.6 R63B.1@151.95,70.6 151.95,70.55 152.697,69.803 158.125,69.803 162.075,65.854 IC9B.5@162.075,64.9
NetIC9B_6: IC9B.6 R65B.1 R66B.1 | length 16
  L1 w0.152: R66B.1@150.55,72.1 152.625,72.1 152.867,71.858 152.867,71.545 153.109,71.303 157.518,71.303 158.584,70.238 158.584,69.995 162.725,65.854 IC9B.6@162.725,64.9
NetIC9B_7: IC9B.7 R67B.1 R68B.1 | length 17.8
  L1 w0.152: R68B.1@150.55,73.6 R67B.1@151.95,73.6 151.95,73.55 152.697,72.803 157.518,72.803 159.043,71.279 159.043,69.995 161.113,67.924 161.304,67.924 163.375,65.854 IC9B.7@163.375,64.9
NetIC9B_15: IC9B.15 R52B.1 R53B.1 | length 23.9
  L1 w0.152: R53B.1@150.55,63.1 152.629,63.1 152.822,62.906 152.822,62.59 153.016,62.397 159.497,62.397 160.129,63.029 163.9,63.029 164.532,63.661 164.532,65.63 160.274,69.889 160.274,70.651 IC9B.15@160.125,70.8
NetIC10A_1: IC10A.1 R3A.1 R4A.1 | length 9.6
  L1 w0.152: R4A.1@130.975,28.5 132.325,28.5 132.375,28.45 133.028,27.797 137.943,27.797 138.947,28.8 IC10A.1@139.9,28.8
NetIC10A_2: IC10A.2 R5A.1 R6A.1 | length 11
  L1 w0.152: R6A.1@130.975,30 133.054,30 133.247,29.806 133.247,29.49 133.441,29.297 137.943,29.297 138.375,29.728 140.209,29.728 140.401,29.536 140.401,28.949 IC10A.2@140.55,28.8
NetIC10A_3: IC10A.3 R73A.1 R74A.1 | length 12.1
  L1 w0.152: R74A.1@130.975,31.5 133.054,31.5 133.294,31.26 133.294,30.944 133.534,30.703 140.25,30.703 141.2,29.754 IC10A.3@141.2,28.8
NetIC10A_4: IC10A.4 R75A.1 R76A.1 | length 13.4
  L1 w0.152: R76A.1@130.975,33 133.05,33 133.292,32.758 133.292,32.445 133.534,32.203 139.4,32.203 141.85,29.754 IC10A.4@141.85,28.8
NetIC10A_5: IC10A.5 R77A.1 R78A.1 | length 14.4
  L1 w0.152: R78A.1@130.975,34.5 132.325,34.5 132.375,34.45 133.122,33.703 138.55,33.703 142.5,29.754 IC10A.5@142.5,28.8
NetIC10A_6: IC10A.6 R79A.1 R80A.1 | length 16
  L1 w0.152: R80A.1@130.975,36 133.05,36 133.292,35.758 133.292,35.445 133.534,35.203 137.943,35.203 139.009,34.138 139.009,33.895 143.15,29.754 IC10A.6@143.15,28.8
NetIC10A_7: IC10A.7 R81A.1 R82A.1 | length 17.7
  L1 w0.152: R82A.1@130.975,37.5 132.325,37.5 132.375,37.45 133.122,36.703 137.943,36.703 139.468,35.179 139.468,33.895 141.538,31.824 141.729,31.824 143.8,29.754 IC10A.7@143.8,28.8
NetIC10A_9: IC10A.9 IC11A.14 | length 16.4
  L1 w0.127: IC11A.14@141.2,46.75 141.2,45.9 141.9,45.2 v1(145.2,45.2) ; IC10A.9@144.45,34.7 144.5,34.75 v1(145.2,34.75)
  L3 w0.127: v1(145.2,34.75) v1(145.2,45.2)
NetIC10A_15: IC10A.15 R1A.1 R2A.1 | length 23.9
  L1 w0.152: R2A.1@130.975,27 133.054,27 133.247,26.806 133.247,26.49 133.441,26.297 143.693,26.297 144.957,27.561 144.957,29.53 140.699,33.789 140.699,34.551 IC10A.15@140.55,34.7
NetIC10B_1: IC10B.1 R3B.1 R4B.1 | length 9.6
  L1 w0.152: R4B.1@150.55,28.55 151.9,28.55 151.95,28.5 152.603,27.847 157.518,27.847 158.522,28.85 IC10B.1@159.475,28.85
NetIC10B_2: IC10B.2 R5B.1 R6B.1 | length 11
  L1 w0.152: R6B.1@150.55,30.05 152.629,30.05 152.822,29.856 152.822,29.54 153.016,29.347 157.518,29.347 157.95,29.778 159.784,29.778 159.976,29.586 159.976,28.999 IC10B.2@160.125,28.85
NetIC10B_3: IC10B.3 R73B.1 R74B.1 | length 12.1
  L1 w0.152: R74B.1@150.55,31.55 152.629,31.55 152.869,31.31 152.869,30.994 153.109,30.753 159.825,30.753 160.775,29.804 IC10B.3@160.775,28.85
NetIC10B_4: IC10B.4 R75B.1 R76B.1 | length 13.4
  L1 w0.152: R76B.1@150.55,33.05 152.625,33.05 152.867,32.808 152.867,32.495 153.109,32.253 158.975,32.253 161.425,29.804 IC10B.4@161.425,28.85
NetIC10B_5: IC10B.5 R77B.1 R78B.1 | length 14.4
  L1 w0.152: R78B.1@150.55,34.55 151.9,34.55 151.95,34.5 152.697,33.753 158.125,33.753 162.075,29.804 IC10B.5@162.075,28.85
NetIC10B_6: IC10B.6 R79B.1 R80B.1 | length 16
  L1 w0.152: R80B.1@150.55,36.05 152.625,36.05 152.867,35.808 152.867,35.495 153.109,35.253 157.518,35.253 158.767,34.004 158.767,33.761 162.725,29.804 IC10B.6@162.725,28.85
NetIC10B_7: IC10B.7 R81B.1 R82B.1 | length 17.8
  L1 w0.152: R82B.1@150.55,37.55 151.9,37.55 151.95,37.5 152.697,36.753 157.518,36.753 159.047,35.225 159.047,33.941 160.585,32.403 160.863,32.403 163.375,29.89 IC10B.7@163.375,28.85
NetIC10B_9: IC10B.9 IC11B.14 | length 16.4
  L1 w0.127: IC11B.14@160.775,46.8 160.775,45.95 161.475,45.25 v1(164.775,45.25) ; IC10B.9@164.025,34.75 164.075,34.8 v1(164.775,34.8)
  L3 w0.127: v1(164.775,34.8) v1(164.775,45.25)
NetIC10B_15: IC10B.15 R1B.1 R2B.1 | length 27.1
  L1 w0.152: R2B.1@150.55,27.05 R1B.1@151.95,27.05 152.629,27.05 152.822,26.856 152.822,26.54 153.016,26.347 159.877,26.347 160.223,26 164.5,26 165.1,26.6 165.1,31.7 164.574,32.226 162.062,32.226 160.274,34.014 160.274,34.601 IC10B.15@160.125,34.75
NetIC11A_1: IC11A.1 R21A.1 R22A.1 | length 9.9
  L1 w0.152: R22A.1@130.975,40.55 R21A.1@132.35,40.55 ; R21A.1@132.35,40.45 133.029,40.45 133.222,40.256 133.222,39.94 133.416,39.747 137.541,39.747 137.641,39.847 137.709,39.847 138.712,40.85 IC11A.1@139.9,40.85
NetIC11A_2: IC11A.2 R24A.1 R25A.1 | length 11
  L1 w0.152: R25A.1@130.975,42.05 R24A.1@132.375,42.05 ; R24A.1@132.375,42 133.054,42 133.247,41.806 133.247,41.49 133.441,41.297 137.644,41.297 138.125,41.778 140.209,41.778 140.401,41.586 140.401,40.999 IC11A.2@140.55,40.85
NetIC11A_3: IC11A.3 R26A.1 R27A.1 | length 12.1
  L1 w0.152: R27A.1@130.975,43.55 R26A.1@132.375,43.55 ; R26A.1@132.375,43.5 133.054,43.5 133.294,43.26 133.294,42.944 133.534,42.703 140.3,42.703 141.2,41.804 IC11A.3@141.2,40.85
NetIC11A_4: IC11A.4 R28A.1 R29A.1 | length 13.3
  L1 w0.152: R29A.1@130.975,45.05 R28A.1@132.375,45.05 ; R28A.1@132.375,45 133.054,45 133.294,44.76 133.294,44.444 133.534,44.203 139.45,44.203 141.85,41.804 IC11A.4@141.85,40.85
NetIC11A_5: IC11A.5 R30A.1 R31A.1 | length 14.6
  L1 w0.152: R31A.1@130.975,46.55 R30A.1@132.375,46.55 ; R30A.1@132.375,46.5 133.054,46.5 133.294,46.26 133.294,45.944 133.534,45.703 138.6,45.703 142.5,41.804 IC11A.5@142.5,40.85
NetIC11A_6: IC11A.6 R32A.1 R33A.1 | length 15.8
  L1 w0.152: R33A.1@130.975,48.05 R32A.1@132.375,48.05 ; R32A.1@132.425,48 132.425,47.95 133.172,47.203 137.993,47.203 139.034,46.163 139.034,45.984 143.15,41.868 IC11A.6@143.15,40.85
NetIC11A_7: IC11A.7 R34A.1 R35A.1 | length 17.7
  L1 w0.152: R35A.1@130.975,49.55 132.325,49.55 132.375,49.5 133.172,48.703 137.993,48.703 139.472,47.225 139.472,45.941 141.54,43.872 141.731,43.872 143.8,41.804 IC11A.7@143.8,40.85
NetIC11A_15: IC11A.15 R83A.1 R84A.1 | length 24
  L1 w0.152: R84A.1@130.975,39.05 132.375,39.05 133.054,39.05 133.247,38.856 133.247,38.49 133.441,38.297 143.643,38.297 144.957,39.611 144.957,41.58 140.699,45.839 140.699,46.601 IC11A.15@140.55,46.75
NetIC11B_1: IC11B.1 R21B.1 R22B.1 | length 9.9
  L1 w0.152: R22B.1@150.55,40.6 R21B.1@151.925,40.6 ; R21B.1@151.925,40.5 152.604,40.5 152.797,40.306 152.797,39.99 152.991,39.797 156.982,39.797 157.082,39.897 157.443,39.897 158.447,40.9 IC11B.1@159.475,40.9
NetIC11B_2: IC11B.2 R24B.1 R25B.1 | length 11
  L1 w0.152: R25B.1@150.55,42.1 R24B.1@151.95,42.1 ; R24B.1@151.95,42.05 152.629,42.05 152.822,41.856 152.822,41.54 153.016,41.347 157.468,41.347 157.95,41.828 159.784,41.828 159.976,41.636 159.976,41.049 IC11B.2@160.125,40.9
NetIC11B_3: IC11B.3 R26B.1 R27B.1 | length 12.1
  L1 w0.152: R27B.1@150.55,43.6 R26B.1@151.95,43.6 ; R26B.1@151.95,43.55 152.629,43.55 152.869,43.31 152.869,42.994 153.109,42.753 159.875,42.753 160.775,41.854 IC11B.3@160.775,40.9
NetIC11B_4: IC11B.4 R28B.1 R29B.1 | length 13.4
  L1 w0.152: R29B.1@150.55,45.1 152.625,45.1 152.867,44.858 152.867,44.495 153.109,44.253 159.025,44.253 161.425,41.854 IC11B.4@161.425,40.9
NetIC11B_5: IC11B.5 R30B.1 R31B.1 | length 14.4
  L1 w0.152: R31B.1@150.55,46.6 151.85,46.6 152.697,45.753 158.175,45.753 162.075,41.854 IC11B.5@162.075,40.9
NetIC11B_6: IC11B.6 R32B.1 R33B.1 | length 16
  L1 w0.152: R33B.1@150.55,48.1 R32B.1@151.95,48.1 ; R32B.1@152,48.05 152.679,48.05 152.919,47.81 152.919,47.494 153.159,47.253 157.568,47.253 158.767,46.054 158.767,45.811 162.725,41.854 IC11B.6@162.725,40.9
NetIC11B_7: IC11B.7 R34B.1 R35B.1 | length 17.7
  L1 w0.152: R35B.1@150.55,49.6 151.9,49.6 151.95,49.55 152.747,48.753 157.568,48.753 159.047,47.275 159.047,45.991 161.115,43.922 161.306,43.922 163.375,41.854 IC11B.7@163.375,40.9
NetIC11B_15: IC11B.15 R83B.1 R84B.1 | length 23.8
  L1 w0.152: R84B.1@150.55,39.1 R83B.1@151.95,39.1 ; R83B.1@151.95,39.05 151.95,39 152.603,38.347 163.218,38.347 164.532,39.661 164.532,41.63 160.274,45.889 160.274,46.151 160.125,46.3 IC11B.15@160.125,46.8
NetIC13_3: IC13.3 LD10.1 R89.1 | length 340.7
  L1 w0.127: v1(0.887,97.473) 0.929,97.515 1.214,97.515 1.356,97.657 67.687,97.657 71.19,94.154 74.11,94.154 74.344,94.388 74.344,94.96 74.56,95.175 IC13.3@75.5,95.175 77.225,95.175 77.6,94.8 77.6,94.192 78.237,93.555 88.072,93.555 90.655,96.137 168.434,96.137 169.271,95.3 v1(169.9,95.3)
  L1 w0.152: v1(171.3,63.6) 171.3,63.15 171.117,62.968 171.117,34.883 173.9,32.1 178,32.1 178.717,31.383 183.943,31.383 186.82,28.505 192.06,28.505 192.2,28.365 R89.1@192.2,27.729
  L3 w0.152: v1@169.9,95.2 169.9,65 v1(171.3,63.6)
  L6 w0.127: LD10.1@-1,18.65 -1.354,19.004 -1.354,64.824 0.554,66.732 0.554,75.469 0.666,75.581 0.666,77.539 0.105,78.099 0.105,80.196 0.613,80.704 0.613,85.966 -0.075,86.655 -0.075,88.149 1.286,89.511 1.286,90.962 0.82,91.428 0.795,91.428 0.506,91.718 0.506,97.092 v1(0.887,97.473)
NetIC13_5: IC13.5 R90.2 | length 5.6
  L1 w0.127: IC13.5@79.9,94.525 80.883,94.525 81.032,94.376 84.376,94.376 84.663,94.663 84.713,94.663 R90.2@85.1,95.05 ; R90.2@85.1,95.15 R90.2@85.1,95.2
NetIC13_6: IC13.6 R91.2 | length 1.9
  L1 w0.127: IC13.6@79.9,95.175 81.475,95.175 R91.2@81.7,95.4
NetIC13_7: IC13.7 R92.2 | length 5.5
  L1 w0.127: IC13.7@79.9,95.825 81.106,95.825 81.14,95.859 84.409,95.859 R92.2@85.031,96.481 ; R92.2@85.031,96.581 R92.2@85.107,96.581
NetIC17_1: IC17.1 IC17.11 R105.1 R107.1 R108.1 | length 14.4
  L1 w0.152: IC17.11@185.858,6.631 185.858,7.958 187.722,9.822 190.355,9.822 190.576,10.043 190.576,10.226 R108.1@190.95,10.6 R107.1@190.95,12.1 R105.1@190.95,13.55 ; IC17.1@187.808,12.431 187.808,12.7 187.956,12.849 189.949,12.849 190.276,13.176 190.576,13.176 R105.1@190.95,13.55 ; R105.1@190.95,13.6 R105.1@190.95,13.55 ; R105.1@190.975,13.575 R105.1@191,13.6
NetIC17_8: IC17.8 R110.1 R114.1 | length 19
  L1 w0.152: R114.1@181.326,23.175 181.326,18.574 182,17.9 182,13.3 181.4,12.7 181.4,10.3 181.6,10.1 R110.1@182.3,10.1 183.1,10.1 183.908,9.292 IC17.8@183.908,6.631
NetIC17_9: IC17.9 IC17.10 R107.2 R108.2 R110.2 | length 14.6
  L1 w0.152: R110.2@182.3,11.7 182.591,11.409 182.939,11.409 184.558,9.79 ; IC17.9@184.558,6.631 184.558,7.856 ; IC17.10@185.208,6.631 185.208,7.631 184.983,7.856 184.558,7.856 ; R107.2@189.35,12.1 R108.2@189.35,10.6 187.5,10.6 186.69,9.79 184.558,9.79 ; 184.558,7.856 184.558,9.79
NetIC18_4: IC18.4 R112.2 | length 5
  L1 w0.127: IC18.4@188.751,30.355 189.855,30.355 190.208,30.708 190.208,32.508 190.7,33 R112.2@191.6,33
NetIC19_5: IC19.5 R23.1 R117.2 | length 5.3
  L1 w0.152: R117.2@143.4,7.4 R23.1@145,7.4 R23.1@145.05,7.4 ; R23.1@145.424,7.026 R23.1@145.05,7.4 ; IC19.5@146.642,5.575 146.143,5.575 145.844,5.874 145.844,7.212 145.656,7.4 R23.1@145.05,7.4
NetIC19_10: IC19.10 R72.1 | length 1.3
  L1 w0.127: IC19.10@149.542,5.575 R72.1@150.822,5.575
NetIC20_5: IC20.5 R118.1 R123.2 | length 4.7
  L1 w0.152: IC20.5@150.02,13.75 150.02,13.996 150.094,14.07 150.951,14.07 151.831,14.95 R123.2@154.03,14.95
NetIC20_7: IC20.7 R121.1 R122.2 | length 4.3
  L1 w0.2: IC20.7@149.02,13.75 149.02,15.512 149.2,15.692 149.2,16.05 R121.1@149.55,16.4 R122.2@151,16.4
NetIC22_4: IC22.4 R16.1 R56.2 | length 3.3
  L1 w0.381: R16.1@166.3,13.893 166.305,13.888 167.882,13.888 R56.2@167.888,13.882 ; IC22.4@167.863,12.207 IC22.4@167.888,12.182 ; IC22.4@167.888,12.207 R56.2@167.888,13.857
NetIC22_5: IC22.5 R86.2 R89.2 R113.2 | length 42.4
  L1 w0.127: v1(189.2,25.6) 189.6,25.6 190.129,26.129 R86.2@190.75,26.129 R89.2@192.2,26.129 R113.2@193.65,26.129
  L1 w0.152: IC22.5@166.938,12.182 166.9,12.22 166.9,12.9 166.746,13.054 165.522,13.054 164.8,13.777 164.8,15.7 168.2,19.1 v1(168.2,25.6)
  L3 w0.152: v1(168.2,25.6) 174.4,25.6 174.8,25.2 184.9,25.2 185.3,25.6 v1(189.2,25.6)
NetLD1_2: LD1.2 R159.2 | length 192
  L1 w0.127: v1(0.846,90.765) v1@0.931,90.765 ; v1(6.872,97.081) 6.881,97.081 7.133,97.333 67.426,97.333 70.967,93.792 77.309,93.792 77.866,93.235 88.346,93.235 90.859,95.747 148.847,95.747 153.727,90.867 153.727,88.373 R159.2@153.8,88.3
  L3 w0.127: v1(0.846,90.765) 0.846,95.669 2.258,97.081 v1(6.872,97.081)
  L6 w0.127: LD1.2@-1,66.85 -1,67.1 -0.563,67.536 0.136,67.536 0.3,67.7 0.3,75.574 0.412,75.686 0.412,77.434 -0.149,77.994 -0.149,80.302 0.359,80.81 0.359,85.861 -0.329,86.55 -0.329,88.375 0.35,89.055 0.35,89.066 0.846,89.561 v1(0.846,90.765)
NetLD2A_2: LD2A.2 R1A.2 | length 1.4
  L1 w0.152: R1A.2@133.975,27 LD2A.2@135.35,27
NetLD2B_2: LD2B.2 R1B.2 | length 1.4
  L1 w0.152: R1B.2@153.55,27.05 LD2B.2@154.925,27.05
NetLD3A_2: LD3A.2 R3A.2 | length 1.4
  L1 w0.152: R3A.2@133.975,28.5 LD3A.2@135.35,28.5
NetLD3B_2: LD3B.2 R3B.2 | length 1.4
  L1 w0.152: R3B.2@153.55,28.55 LD3B.2@154.925,28.55
NetLD4_2: LD4.2 R20.2 | length 1.6
  L1 w0.4: LD4.2@152.225,78.667 R20.2@153.8,78.667
NetLD5A_2: LD5A.2 R5A.2 | length 1.4
  L1 w0.152: R5A.2@133.975,30 LD5A.2@135.35,30
NetLD5B_2: LD5B.2 R5B.2 | length 1.4
  L1 w0.152: R5B.2@153.55,30.05 LD5B.2@154.925,30.05
NetLD6A_2: LD6A.2 R73A.2 | length 1.4
  L1 w0.152: R73A.2@133.975,31.5 134.025,31.55 LD6A.2@135.375,31.55
NetLD6B_2: LD6B.2 R73B.2 | length 1.4
  L1 w0.152: R73B.2@153.55,31.55 153.6,31.6 LD6B.2@154.95,31.6
NetLD7A_2: LD7A.2 R75A.2 | length 1.4
  L1 w0.152: R75A.2@133.975,33 LD7A.2@135.35,33
NetLD7B_2: LD7B.2 R75B.2 | length 1.4
  L1 w0.152: R75B.2@153.55,33.05 LD7B.2@154.925,33.05
NetLD8A_2: LD8A.2 R77A.2 | length 1.4
  L1 w0.152: R77A.2@133.975,34.5 LD8A.2@135.35,34.5
NetLD8B_2: LD8B.2 R77B.2 | length 1.4
  L1 w0.152: R77B.2@153.55,34.55 LD8B.2@154.925,34.55
NetLD9A_2: LD9A.2 R79A.2 | length 1.4
  L1 w0.152: R79A.2@133.975,36 LD9A.2@135.35,36
NetLD9B_2: LD9B.2 R79B.2 | length 1.4
  L1 w0.152: R79B.2@153.55,36.05 LD9B.2@154.925,36.05
NetLD10_2: LD10.2 R93.1 | length 244.7
  L1 w0.127: v1(1.643,97.217) 1.651,97.224 2.005,97.224 2.099,97.319 6.167,97.319 6.399,97.087 6.399,96.871 6.629,96.641 7.141,96.641 7.542,97.042 67.305,97.042 70.847,93.501 77.188,93.501 77.745,92.944 88.621,92.944 91.024,95.347 148.047,95.347 152.127,91.267 152.127,88.373 R93.1@152.2,88.3
  L6 w0.127: LD10.2@-1,15.15 -1,15.4 -0.563,15.836 -0.244,15.836 0.3,16.381 0.3,19 -1.1,20.4 -1.1,64.577 0.808,66.485 0.808,75.364 0.966,75.521 0.966,77.599 0.359,78.205 0.359,80.091 0.867,80.599 0.867,86.071 0.179,86.76 0.179,87.923 1.54,89.285 1.54,91.067 0.925,91.682 0.9,91.682 0.76,91.823 0.76,96.193 1.179,96.612 1.179,96.752 v1(1.643,97.217)
NetLD11_2: LD11.2 R160.2 | length 1.6
  L1 w0.4: LD11.2@152.225,83.533 R160.2@153.8,83.533
NetLD12A_2: LD12A.2 R81A.2 | length 1.4
  L1 w0.152: R81A.2@133.975,37.5 LD12A.2@135.35,37.5
NetLD12B_2: LD12B.2 R81B.2 | length 1.4
  L1 w0.152: R81B.2@153.55,37.55 LD12B.2@154.925,37.55
NetLD13A_2: LD13A.2 R83A.2 | length 1.4
  L1 w0.152: R83A.2@133.975,39.05 LD13A.2@135.35,39.05
NetLD13B_2: LD13B.2 R83B.2 | length 1.4
  L1 w0.152: R83B.2@153.55,39.1 LD13B.2@154.925,39.1
NetLD14A_2: LD14A.2 R21A.2 | length 1.4
  L1 w0.152: R21A.2@133.975,40.55 LD14A.2@135.35,40.55
NetLD14B_2: LD14B.2 R21B.2 | length 1.4
  L1 w0.152: R21B.2@153.55,40.6 LD14B.2@154.925,40.6
NetLD15A_2: LD15A.2 R24A.2 | length 1.4
  L1 w0.152: R24A.2@133.975,42.05 LD15A.2@135.35,42.05
NetLD15B_2: LD15B.2 R24B.2 | length 1.6
  L1 w0.152: R24B.2@153.55,42.1 153.779,42.329 154.696,42.329 LD15B.2@154.925,42.1
NetLD16A_2: LD16A.2 R26A.2 | length 1.6
  L1 w0.152: R26A.2@133.975,43.55 134.204,43.779 135.196,43.779 LD16A.2@135.375,43.6
NetLD16B_2: LD16B.2 R26B.2 | length 1.4
  L1 w0.152: R26B.2@153.55,43.6 153.6,43.65 LD16B.2@154.95,43.65
NetLD17A_2: LD17A.2 R28A.2 | length 1.4
  L1 w0.152: R28A.2@133.975,45.05 LD17A.2@135.35,45.05
NetLD17B_2: LD17B.2 R28B.2 | length 1.4
  L1 w0.152: R28B.2@153.55,45.1 LD17B.2@154.925,45.1
NetLD18A_2: LD18A.2 R30A.2 | length 1.6
  L1 w0.152: R30A.2@133.975,46.55 134.204,46.779 135.121,46.779 LD18A.2@135.35,46.55
NetLD18B_2: LD18B.2 R30B.2 | length 1.4
  L1 w0.152: R30B.2@153.55,46.6 LD18B.2@154.925,46.6